# EAGLE board Slave_Pedal_PCB_rev1 (EAGLE 9.7.0)
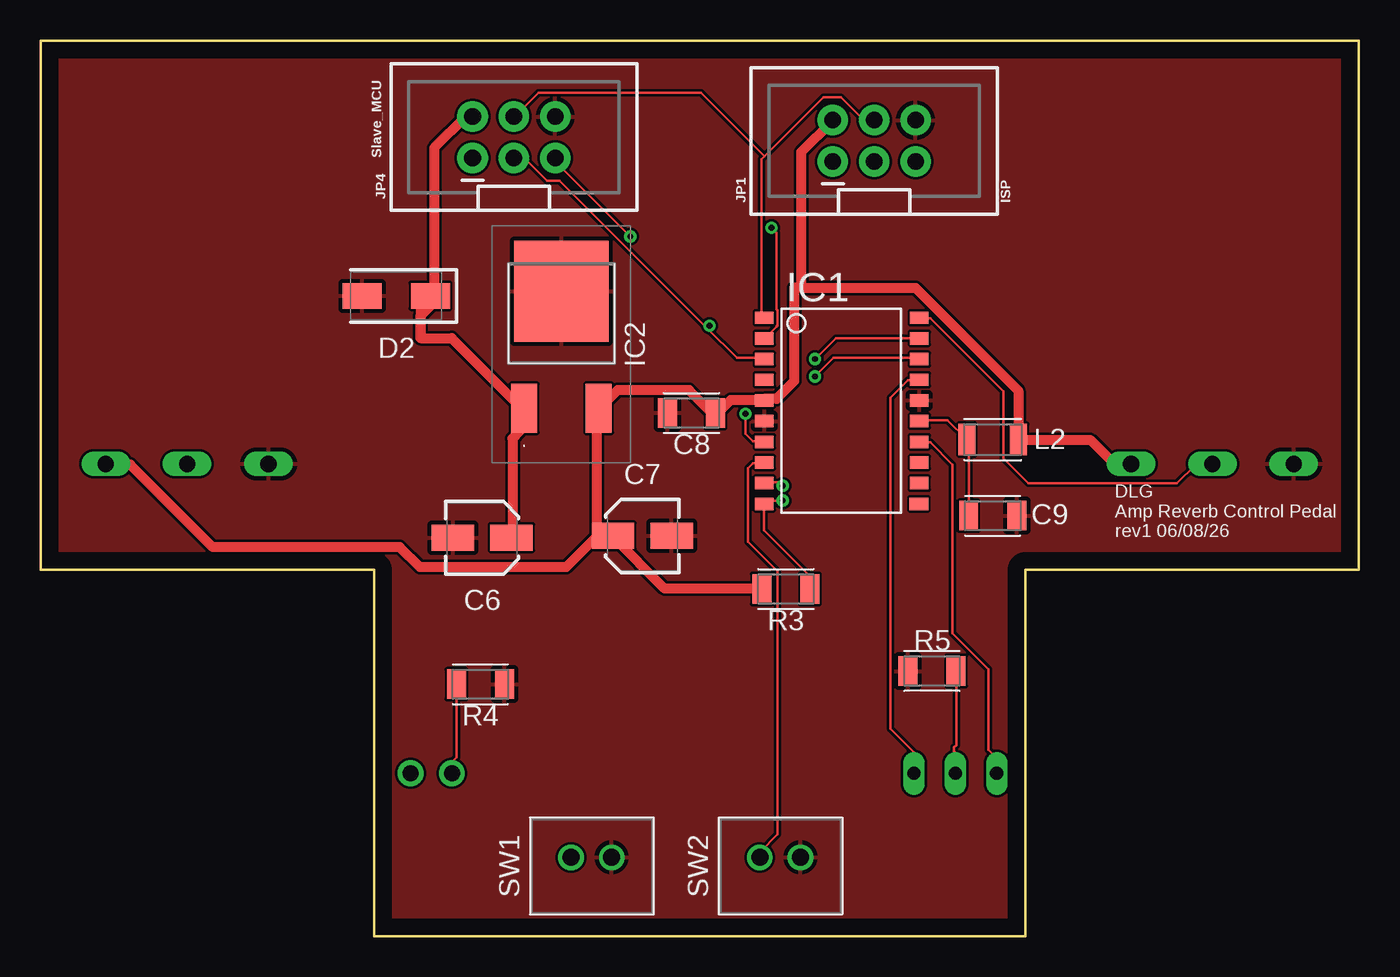
[diagram p0: board, top side]
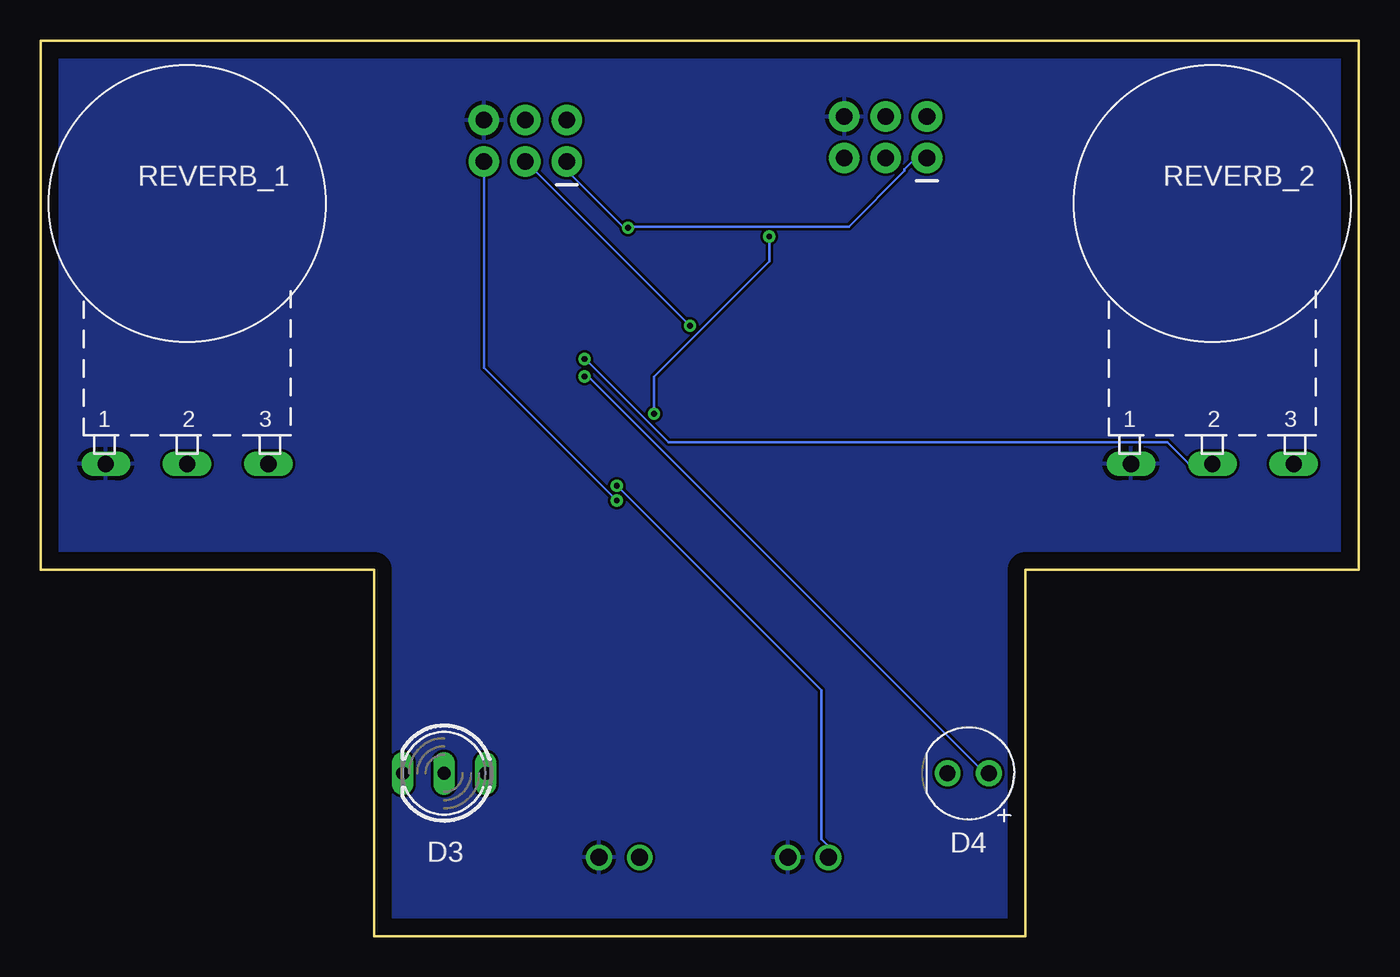
[diagram p1: board, bottom side, seen from below]

Size 81 x 55 mm. Coordinates in mm from the lower left corner, seen from the top.
Outline: 0,55 0,22.5 20.5,22.5 20.5,0 60.5,0 60.5,22.5 81,22.5 81,55 0,55
Copper layers (1*16): Top 0.035mm / dielectric 1.5mm / Bottom 0.035mm
Design rules "Fusion Electronics Design Rules": minimum track width 6mil, minimum drill 0.35mm, track to track 6mil, track to pad 6mil, pad to pad 6mil, via to via 6mil, smd to smd 6mil, copper to edge 40mil, drill to drill 6mil, minimum pad ring 10mil, minimum via ring 8mil, stop-mask expansion 4mil, vias tented up to drill 9999mil, thermal gap 10mil
Net classes: 1 Power: width 0.6 mm

## Footprints (pad centres in the part's own frame; a part is rotated, then mirrored left to right if it is on the bottom)
CAPAE430X430N = smd 2.6 x 1.6: 1 -1.8,0; 2 1.8,0
CAPC3216X135 = smd 1.165 x 1.815: 1 -1.475,0; 2 1.475,0
DIOM5226X290N = smd 2.392 x 1.565: 1 -2.108,0; 2 2.108,0
DUOLED-C-5MM = drill 0.813 long: AR 2.54,0; AX -2.54,0; C 0,0
LEDRD254W60D565H860B = drill 0.981 pad 1.581: 1 -1.27,0; 2 1.27,0
SO20L = smd 0.762 x 1.143: 1 -5.08,-5.131; 2 -3.81,-5.131; 3 -2.54,-5.131; 4 -1.27,-5.131; 5 0,-5.131; 6 1.27,-5.131; 7 2.54,-5.131; 8 3.81,-5.131; 9 5.08,-5.131; 10 6.35,-5.131; 11 6.35,4.369; 12 5.08,4.394; 13 3.81,4.394; 14 2.54,4.394; 15 1.27,4.394; 16 0,4.394; 17 -1.27,4.394; 18 -2.54,4.394; 19 -3.81,4.394; 20 -5.08,4.394
LM317MADTRKG = smd 3 x 1.6: 1 4.08,-2.285; 3 4.08,2.285 | smd 6.2 x 5.8: 2 -3.1,0
2X3-SHROUDED = drill 1.016 pad 1.88: 1 -1.27,2.54; 2 1.27,2.54; 3 -1.27,0; 4 1.27,0; 5 -1.27,-2.54; 6 1.27,-2.54
INDC3216X190 = smd 1.043 x 1.91: 1 -1.584,0; 2 1.584,0
RESC3216X70 = smd 1.165 x 1.815: 1 -1.475,0; 2 1.475,0
16MM = drill 1 long: 1 -5,-16; 2 0,-16; 3 5,-16
B2B-XH-A = drill 1.05: 1 0.525,1.27; 2 0.525,-1.23

## Placement (x,y rotation side)
C6  47uF  [CAPAE430X430N]  27.13,24.47 180 top
C7  1uF  [CAPAE430X430N]  36.97,24.58 0 top
C8  0.1uF  [CAPC3216X135]  39.99,32.13 180 top
C9  0.1uF  [CAPC3216X135]  58.5,25.82 180 top
D2  1N4001  [DIOM5226X290N]  21.85,39.32 180 top
D3  [DUOLED-C-5MM]  56.21,10 180 bottom
D4  LED_RED  [LEDRD254W60D565H860B]  24,10 180 bottom
IC1  TINY26LS  [SO20L]  49.6,32.9 270 top
IC2  MC7805BDTRKG  [LM317MADTRKG]  32,36.5 270 top
JP1  ISP  [2X3-SHROUDED]  51.22,48.85 90 top
JP4  Slave_MCU  [2X3-SHROUDED]  29.08,49.07 90 top
L2  10uH  [INDC3216X190]  58.5,30.5 180 top
R3  10k  [RESC3216X70]  45.79,21.32 180 top
R4  1k  [RESC3216X70]  27.02,15.47 180 top
R5  1k  [RESC3216X70]  54.77,16.28 0 top
REVERB_1  100kA  [16MM]  72,45 0 bottom
REVERB_2  100kA  [16MM]  9,45 0 bottom
SW1  MOMENTARYJST  [B2B-XH-A]  33.86,4.31 90 top
SW2  MOMENTARYJST  [B2B-XH-A]  45.46,4.31 90 top

## Library data of the parts
C6 C7 = Capacitor; CATEGORY_L1: Capacitor; CATEGORY_L2: Aluminum Electrolytic Capacitors; CATEGORY_L3: Radial Can; DESCRIPTION: ECAP (Aluminum Electrolytic Capacitor), 0.157" Dia (4.00mm) body Size, 0.217" (5.50mm) Height - Seated (Max), 0.169" L x 0.169" W (4.30mm x 4.30mm) Surface Mount Land Size; PACKAGE: Surface Mount
C8 C9 = Capacitor; CATEGORY_L1: Capacitor; CATEGORY_L2: Ceramic Capacitors; CATEGORY_L3: MLCC; PACKAGE: Surface Mount; PACKAGE_SIZE: 1206
D2 = Diode; CATEGORY_L1: Diodes; CATEGORY_L2: Rectifiers; CATEGORY_L3: Ultra Fast Recovery Rectifiers; DATASHEET: https://www.onsemi.com/download/data-sheet/pdf/es1d-d.pdf; DESCRIPTION: Diode 200 V 1A Surface Mount DO-214AC (SMA); FORWARD_CURRENT: 1A; FORWARD_VOLTAGE: 920mV; MANUFACTURER: onsemi; MPN: ES1D; OPERATING_TEMPERATURE: -55°C ~ 150°C; PACKAGE: Surface Mount; PART_STATUS: Active; REVERSE_VOLTAGE: 200V; ROHS: Compliant; SERIES: ES1D
D3 = led
D4 = Tinkercad; CATEGORY: Opto-Electronic; SUB-CATEGORY: LED
IC1 = atmel; MPN: ATTINY26L-8SU; OC_FARNELL: 9171665; OC_NEWARK: 01M6921
IC2 = MC7805BDTRKG; DESCRIPTION: Output Current in Excess of 1.0 A; No External Components Required; Internal Thermal Overload Protection; Internal Short Circuit Current Limiting; Output Transistor Safe-Area Compensation; Output Voltage Offered in 2% and 4% Tolerance; Pb-Free Packages are Available; HEIGHT: 2.38mm; MANUFACTURER_NAME: onsemi; MANUFACTURER_PART_NUMBER: MC7805BDTRKG; MOUSER_PART_NUMBER: 863-MC7805BDTRKG; MOUSER_PRICE-STOCK: https://www.mouser.co.uk/ProductDetail/onsemi/MC7805BDTRKG?qs=%252B9%2Fcbd0IE0RVSCV5SBH6%2FA%3D%3D
JP1 JP4 = SparkFun-Connectors; PROD_ID: CONN-14886
L2 = Inductor; CATEGORY_L1: Inductors; DESCRIPTION: Chip 3.20 X 1.60 X 1.90 mm body 1206(3216-METRIC); PACKAGE: Surface Mount; PACKAGE_SIZE: 1206
R3-R5 = Resistor; CATEGORY_L1: Resistors; DESCRIPTION: Chip Resistor 3.20 X 1.60 X 0.70 mm body 1206(3216-METRIC) Package; PACKAGE: Surface Mount; PACKAGE_SIZE: 1206
REVERB_1 REVERB_2 = gm-pots
SW1 SW2 = gm-switches

## Nets
+5V [Power]: C7.1 C8.1 IC1.5 IC2.3 JP1.2 L2.1 R3.2 REVERB_1.3 REVERB_2.3
+9V [Power]: C6.1 D2.1 IC2.1 JP4.2
ADC0: IC1.20 REVERB_1.2
ADC1: IC1.19 REVERB_2.2
GND: C6.2 C7.2 C8.2 C9.1 D2.2 IC1.6 IC1.16 IC2.2 JP1.6 JP4.6 R4.1 R5.1 REVERB_1.1 REVERB_2.1 SW1.2 SW2.2
MISO: IC1.2 JP1.1 JP4.1
MOSI: IC1.1 JP1.4 JP4.4
N$1: IC1.9 SW1.1
N$2: IC1.8 SW2.1
N$3: D3.AR IC1.14
N$4: D4.1 IC1.18
N$5: D3.AX IC1.17
N$6: C9.2 IC1.15 L2.2
N$7: D4.2 R4.2
N$8: D3.C R5.2
RESET: IC1.10 JP1.5 R3.1
SCK: IC1.3 JP1.3 JP4.3
SDO: IC1.7 JP4.5

## Tracks (layer width: path | path; a pad name or v marks a point on that pad's centre or on a via)
+5V
  Top 0.61: C7.1 35.17,24.51 38.35,21.34 44.3,21.34 R3.2 | 34.17,24.54 32.29,22.66 23.3,22.66 22.07,23.9 10.57,23.9 5.52,28.96 4.07,28.96 REVERB_2.3 | 34.17,24.54 35.16,24.54 C7.1 | REVERB_1.3 66.93,29.03 65.94,29.03 64.49,30.48 60.15,30.48 L2.1 60.07,30.56 60.07,33.5 53.76,39.82 46.75,39.82 | 46.75,39.82 46.75,48.17 48.64,50.06 JP1.2 | 34.17,24.54 34.17,32.16 34.32,32.31 IC2.3 34.32,32.38 35.46,33.53 39.85,33.53 41.22,32.16 41.41,32.16 C8.1 41.48,32.16 41.63,32.16 42.4,32.92 44.45,32.92 IC1.5 44.45,32.99 45.22,32.99 46.3,34.08 46.3,39.82 46.75,39.82 | 34.17,24.54 C7.1
+9V
  Top 0.6: D2.1 23.34,38.71 23.34,36.73
  Top 0.61: C6.1 28.98,24.54 28.98,30.56 29.44,31.01 29.44,32.46 IC2.1 29.67,32.46 29.52,32.46 25.25,36.73 23.34,36.73 23.34,38.1 24.18,38.94 24.18,48.42 26.1,50.34 JP4.2
ADC0
  Top 0.152: IC1.20 54.05,37.95 54.66,37.95 59.16,33.45 59.16,29.34 60.68,27.81 69.83,27.81 70.97,28.96 71.96,28.96 REVERB_1.2
ADC1  (via drill 0.35)
  Top 0.152: IC1.19 53.98,36.73 48.87,36.73 v47.58,35.44
  Bottom 0.152: REVERB_2.2 9.02,29.03 10.47,29.03 11.76,30.33 42.41,30.33 47.53,35.44 v47.58,35.44
GND
  pour Top: 20.56,22.54 20.58,22.52 20.58,0.08 60.42,0.08 60.42,22.52 60.44,22.54 60.46,22.56 60.48,22.58 80.92,22.58 80.92,54.92 0.08,54.92 0.08,22.58 20.52,22.58 20.54,22.56
  pour Bottom: 20.56,22.54 20.58,22.52 20.58,0.08 60.42,0.08 60.42,22.52 60.44,22.54 60.46,22.56 60.48,22.58 80.92,22.58 80.92,54.92 0.08,54.92 0.08,22.58 20.52,22.58 20.54,22.56
MISO  (via drill 0.35)
  Top 0.152: IC1.2 44.53,36.73 45.22,37.41 45.22,37.45 45.27,37.5 45.27,38.46 45.22,38.51 45.22,43.21 v44.91,43.51
  Bottom 0.152: 45.14,43.51 48.64,47.02 48.64,47.55 JP1.1 | JP4.1 26.55,47.78 27.23,47.78 27.92,47.09 27.92,47.02 31.35,43.59 45.06,43.59 45.14,43.51 | 45.14,43.51 v44.91,43.51
MOSI
  Top 0.152: 44.49,47.89 48.11,51.51 49.18,51.51 50.55,50.14 51.16,50.14 JP1.4 | 44.49,47.89 40.57,51.82 30.58,51.82 29.14,50.37 JP4.4 | 44.49,47.89 44.31,47.71 44.31,38.14 IC1.1
N$1  (via drill 0.35)
  Top 0.152: v45.6,27.66 45.37,27.89 44.53,27.89 IC1.9
  Bottom 0.152: v45.6,27.66 33.02,15.09 33.02,5.94 32.64,5.56 32.64,4.88 SW1.1
N$2
  Top 0.152: IC1.8 44.45,29.03 43.77,29.03 43.46,28.73 43.46,24.23 45.29,22.4 45.29,6.25 44.22,5.18 44.22,4.88 SW2.1
N$3
  Top 0.152: IC1.14 54.05,30.33 54.66,30.33 56.03,28.96 56.03,18.59 58.24,16.38 58.24,11.43 58.7,10.97 58.7,10.06 D3.AR
N$4  (via drill 0.35)
  Top 0.152: IC1.18 53.98,35.51 48.72,35.51 v47.58,34.38
  Bottom 0.152: D4.1 22.74,10.06 23.04,10.06 47.36,34.38 v47.58,34.38
N$5
  Top 0.152: IC1.17 53.98,34.14 53.29,34.14 52.23,33.07 52.23,12.72 53.67,11.28 53.67,10.06 D3.AX
N$6
  Top 0.152: IC1.15 54.05,31.7 55.73,31.7 56.87,30.56 L2.2 56.95,30.48 57.03,30.4 57.03,25.83 C9.2
N$7
  Top 0.152: R4.2 25.55,15.47 25.55,10.97 25.33,10.74 25.33,10.06 D4.2
N$8
  Top 0.152: R5.2 56.26,16.23 56.26,11.73 56.11,11.58 56.11,11.35 56.19,11.28 56.19,10.06 D3.C
RESET  (via drill 0.35)
  Top 0.152: R3.1 47.2,21.34 47.2,22.17 44.45,24.92 44.45,26.52 IC1.10 44.53,26.59 44.68,26.75 v45.6,26.75
  Bottom 0.152: v45.6,26.75 53.75,34.9 53.75,47.55 JP1.5
SCK  (via drill 0.35)
  Top 0.152: 40.95,37.34 31.88,46.41 31.12,46.41 29.75,47.78 29.14,47.78 JP4.3 | 40.95,37.34 42.78,35.51 44.45,35.51 IC1.3 | 40.95,37.34 v41.1,37.49
  Bottom 0.152: v41.1,37.49 51.16,47.55 JP1.3
SDO  (via drill 0.35)
  Top 0.152: v36.22,42.98 31.65,47.55 31.65,47.78 JP4.5 | IC1.7 44.45,30.4 43.77,30.4 43.31,30.86 v43.31,32.08
  Bottom 0.152: v36.22,42.98 36.22,41.45 43.31,34.37 v43.31,32.08

## Text on the board
tPlace: DLG / Amp Reverb Control Pedal / rev1 06/08/26